# EAGLE board IRSensor (EAGLE 9.7.0)
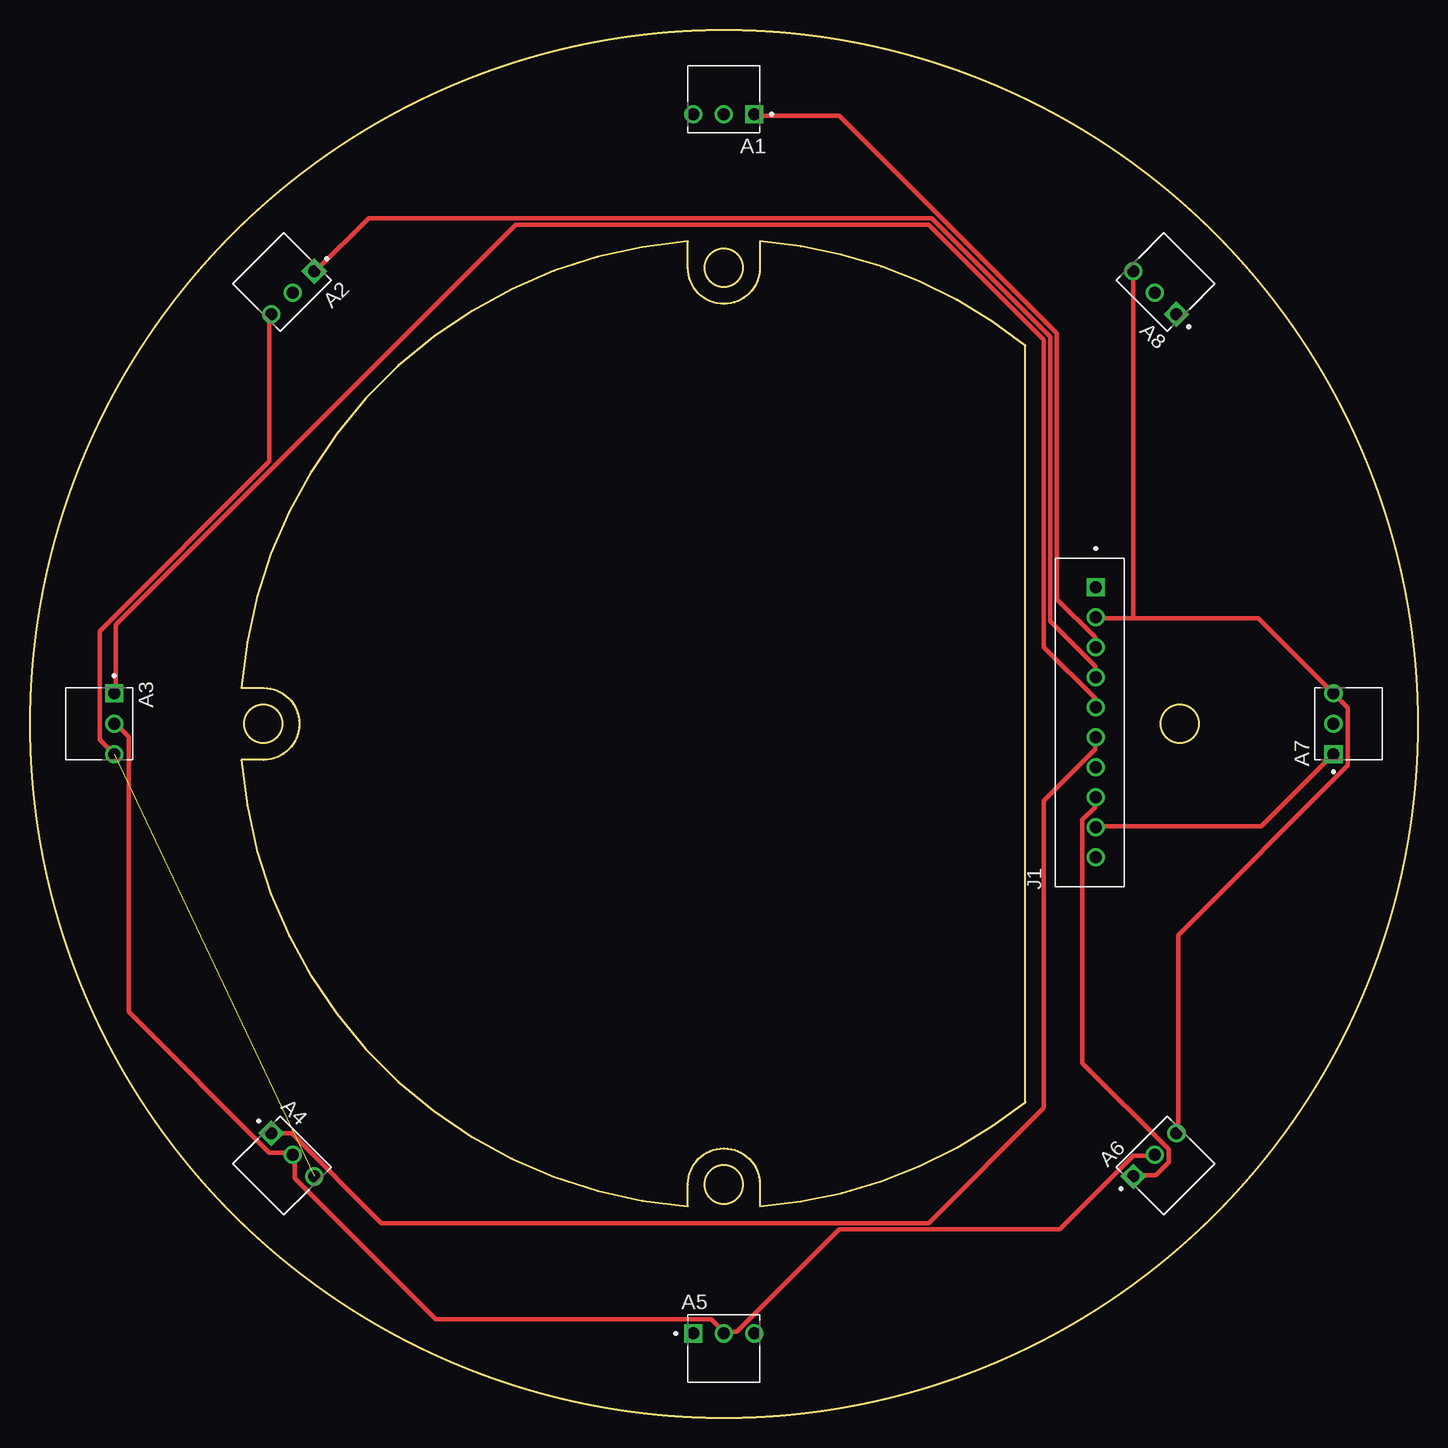
[diagram p0: board, top side]
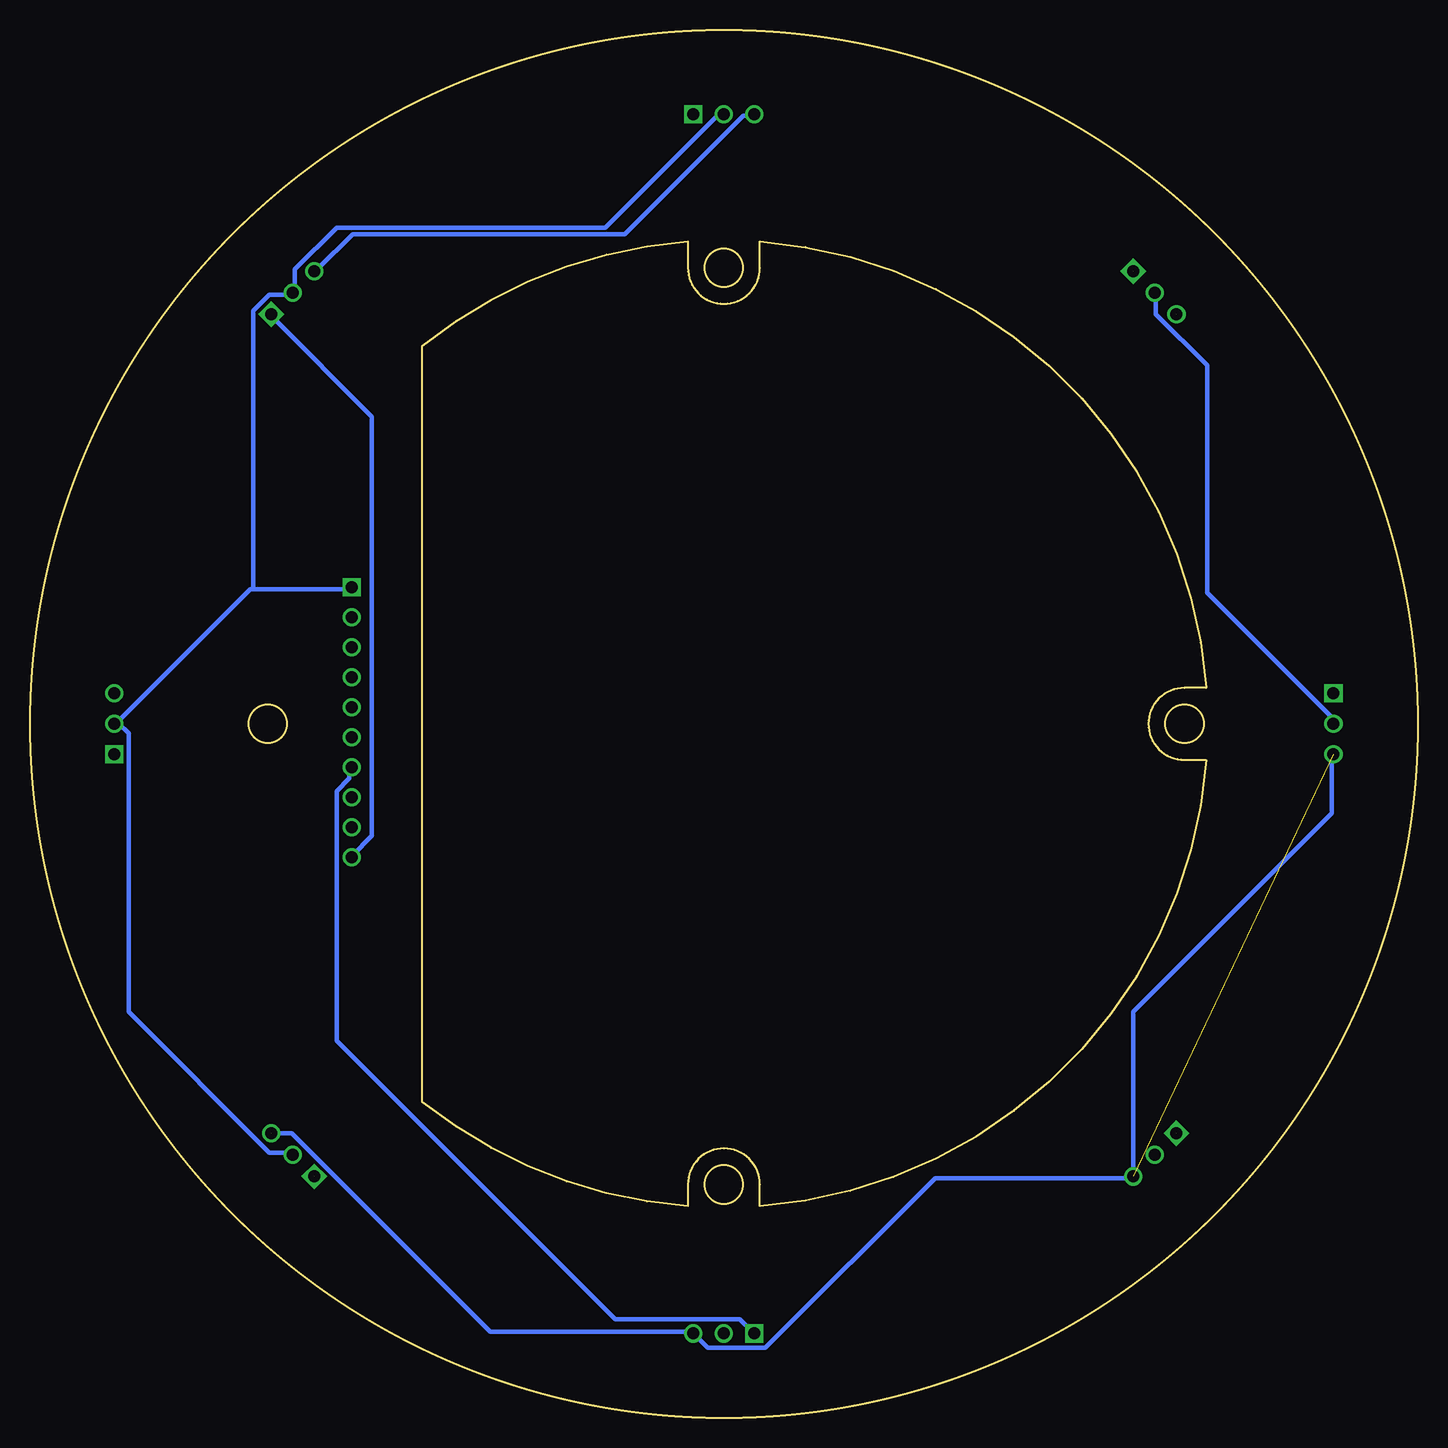
[diagram p1: board, bottom side, seen from below]

Size 115.64 x 115.64 mm. Coordinates in mm from the lower left corner, seen from the top.
Outline: 19.44,60.82 arc-180 19.44,54.82 17.62,54.82 arc81 54.82,17.62 54.82,19.44 arc-180 60.82,19.44 60.82,17.62 arc34 82.94,26.29 82.94,89.34 arc34 60.82,98.02 60.82,95.82 arc-180 54.82,95.82 54.82,98.02 arc81 17.62,60.82 19.44,60.82
Outline: circle at 19.44,57.82 radius 1.6
Outline: circle at 57.82,19.44 radius 1.6
Outline: circle at 57.82,57.82 radius 57.82
Outline: circle at 57.82,95.82 radius 1.6
Outline: circle at 95.82,57.82 radius 1.6
Copper layers (1*16): Top / Bottom
Stack-up Default Layer Stack: Top User Defined 0.035mm / Dielectric-1 User Defined 1.5mm / Bottom User Defined 0.035mm
Design rules: minimum drill size 0.35mm, minimum copper width 15mil, keepout clearance 0mil, drill distance 6mil, via restrict clearance 0mil, dimension clearance 40mil, restrict clearance 0mil, copper clearance wire_polygon to wire_polygon 6mil, copper clearance wire_polygon to pad_smd 6mil, copper clearance wire_polygon to via 6mil, copper clearance pad_smd to pad_smd 6mil, copper clearance pad_smd to via 6mil, copper clearance via to via 6mil, copper clearance smd to pad (same net) 6mil, copper clearance smd to via (same net) 6mil, copper clearance smd to smd (same net) 6mil

## Footprints (pad centres in the part's own frame; a part is rotated, then mirrored left to right if it is on the bottom)
XDCR_TSSP4038 = drill 1.01 square: 1 -2.54,0 | drill 1.01: 2 0,0; 3 2.54,0
JST_B10B-XH-A(LF)(SN) = drill 1 square: 1 11.25,-0.525 | drill 1: 2 8.75,-0.525; 3 6.25,-0.525; 4 3.75,-0.525; 5 1.25,-0.525; 6 -1.25,-0.525; 7 -3.75,-0.525; 8 -6.25,-0.525; 9 -8.75,-0.525; 10 -11.25,-0.525

## Placement (x,y rotation side)
A1  TSSP4038  [XDCR_TSSP4038]  57.82,108.62 180 top
A2  TSSP4038  [XDCR_TSSP4038]  21.9,93.74 225 top
A3  TSSP4038  [XDCR_TSSP4038]  7.02,57.82 270 top
A4  TSSP4038  [XDCR_TSSP4038]  21.9,21.9 315 top
A5  TSSP4038  [XDCR_TSSP4038]  57.82,7.02 0 top
A6  TSSP4038  [XDCR_TSSP4038]  93.74,21.9 45 top
A7  TSSP4038  [XDCR_TSSP4038]  108.62,57.82 90 top
A8  TSSP4038  [XDCR_TSSP4038]  93.74,93.74 135 top
J1  B10B-XH-A(LF)(SN)  [JST_B10B-XH-A(LF)(SN)]  88.3,57.94 90 top

## Library data of the parts
A1-A8 = TSSP4038; MANUFACTURER: Vishay; MAXIMUM_PACKAGE_HEIGHT: 10.25 mm; PARTREV: 2.3; STANDARD: IPC 7351B
J1 = B10B-XH-A_LF__SN_; AVAILABILITY: In Stock; CHECK_PRICES: https://www.snapeda.com/parts/B10B-XH-A%20(LF)(SN)/JST+Sales+America+Inc./view-part/?ref=eda; DESCRIPTION: Connector Header Through Hole 10 position 0.098 (2.50mm); MF: JST Sales; MP: B10B-XH-A (LF)(SN); PACKAGE: None; PRICE: None; SNAPEDA_LINK: https://www.snapeda.com/parts/B10B-XH-A%20(LF)(SN)/JST+Sales+America+Inc./view-part/?ref=snap

## Nets
5V: A1.3 A2.3 A3.3 A4.3 A5.3 A6.3 A7.3 A8.3 J1.2
D1: A1.1 J1.3
D2: A2.1 J1.4
D3: A3.1 J1.5
D4: A4.1 J1.6
D5: A5.1 J1.7
D6: A6.1 J1.8
D7: A7.1 J1.9
D8: A8.1 J1.10
GND: A1.2 A2.2 A3.2 A4.2 A5.2 A6.2 A7.2 A8.2 J1.1

## Tracks (layer width: path | path; a pad name or v marks a point on that pad's centre or on a via)
5V  (3 unrouted)
  Top 0.381: A2.3 19.95,91.69 19.95,79.69 5.81,65.55 5.81,56.49 6.88,55.42 A3.3 | 91.96,66.62 102.36,66.62 108.49,60.49 A7.3 108.76,60.22 109.83,59.15 109.83,54.35 95.69,40.22 95.69,23.95 A6.3 | 91.96,66.62 89.02,66.62 J1.2 | 91.96,66.62 91.96,95.42 A8.3
  Bottom 0.381: A3.3 7.15,55.15 7.15,50.35 23.68,33.82 23.68,20.21 A4.3 23.95,19.95 40.22,19.95 54.35,5.81 59.15,5.81 60.22,6.88 A5.3 60.49,7.15 77.29,7.15 93.82,23.68 95.42,23.68 A6.3 | A1.3 55.42,108.49 56.22,108.49 66.09,98.62 88.76,98.62 91.69,95.69 A8.3
D1
  Top 0.381: J1.3 88.76,64.22 88.76,65.02 85.56,68.22 85.56,90.36 67.42,108.49 60.49,108.49 A1.1
D2  (1 unrouted)
  Top 0.381: J1.4 88.76,61.82 88.76,62.62 85.02,66.35 85.02,90.09 75.15,99.96 28.22,99.96 23.95,95.69 A2.1
D3
  Top 0.381: J1.5 88.76,59.42 88.76,59.95 84.49,64.22 84.49,89.82 74.89,99.42 40.48,99.42 7.15,66.09 7.15,60.49 A3.1
D4  (1 unrouted)
  Top 0.381: J1.6 88.76,56.49 88.76,55.69 84.49,51.42 84.49,25.82 74.89,16.21 29.28,16.21 21.81,23.68 20.21,23.68 A4.1
D5
  Bottom 0.381: J1.7 89.02,54.09 89.02,53.29 90.09,52.22 90.09,31.42 66.89,8.21 56.49,8.21 55.42,7.15 A5.1
D6  (1 unrouted)
  Top 0.381: J1.8 88.76,51.69 88.76,50.89 87.69,49.82 87.69,29.55 94.89,22.35 94.89,21.28 93.82,20.21 91.96,20.21 A6.1
D7
  Top 0.381: J1.9 89.02,49.29 102.63,49.29 108.49,55.15 A7.1
D8
  Bottom 0.381: J1.10 88.76,46.88 87.16,48.48 87.16,83.42 95.42,91.69 A8.1
GND
  Top 0.381: A3.2 7.15,57.82 8.21,56.75 8.21,33.82 19.95,22.08 21.81,22.08 A4.2 22.08,21.81 22.08,19.95 33.82,8.21 56.75,8.21 57.82,7.15 | 57.82,7.15 58.89,7.15 67.42,15.68 85.82,15.68 91.96,21.81 93.56,21.81 A6.2 | 57.82,7.15 A5.2 57.82,7.15
  Bottom 0.381: A3.2 7.15,57.82 7.15,58.35 17.55,68.75 17.55,87.69 21.81,91.96 21.81,93.56 A2.2 | 97.02,69.02 97.29,69.02 108.49,57.82 A7.2 108.23,57.82 107.43,57.02 107.43,33.82 95.69,22.08 93.82,22.08 A6.2 | 97.02,69.02 89.02,69.02 J1.1 | 97.02,69.02 97.02,92.22 95.69,93.56 93.82,93.56 A8.2 93.56,93.82 93.56,95.69 90.09,99.16 67.69,99.16 58.35,108.49 57.82,108.49 A1.2